# EAGLE board eagle_sample (EAGLE 9.6.2)
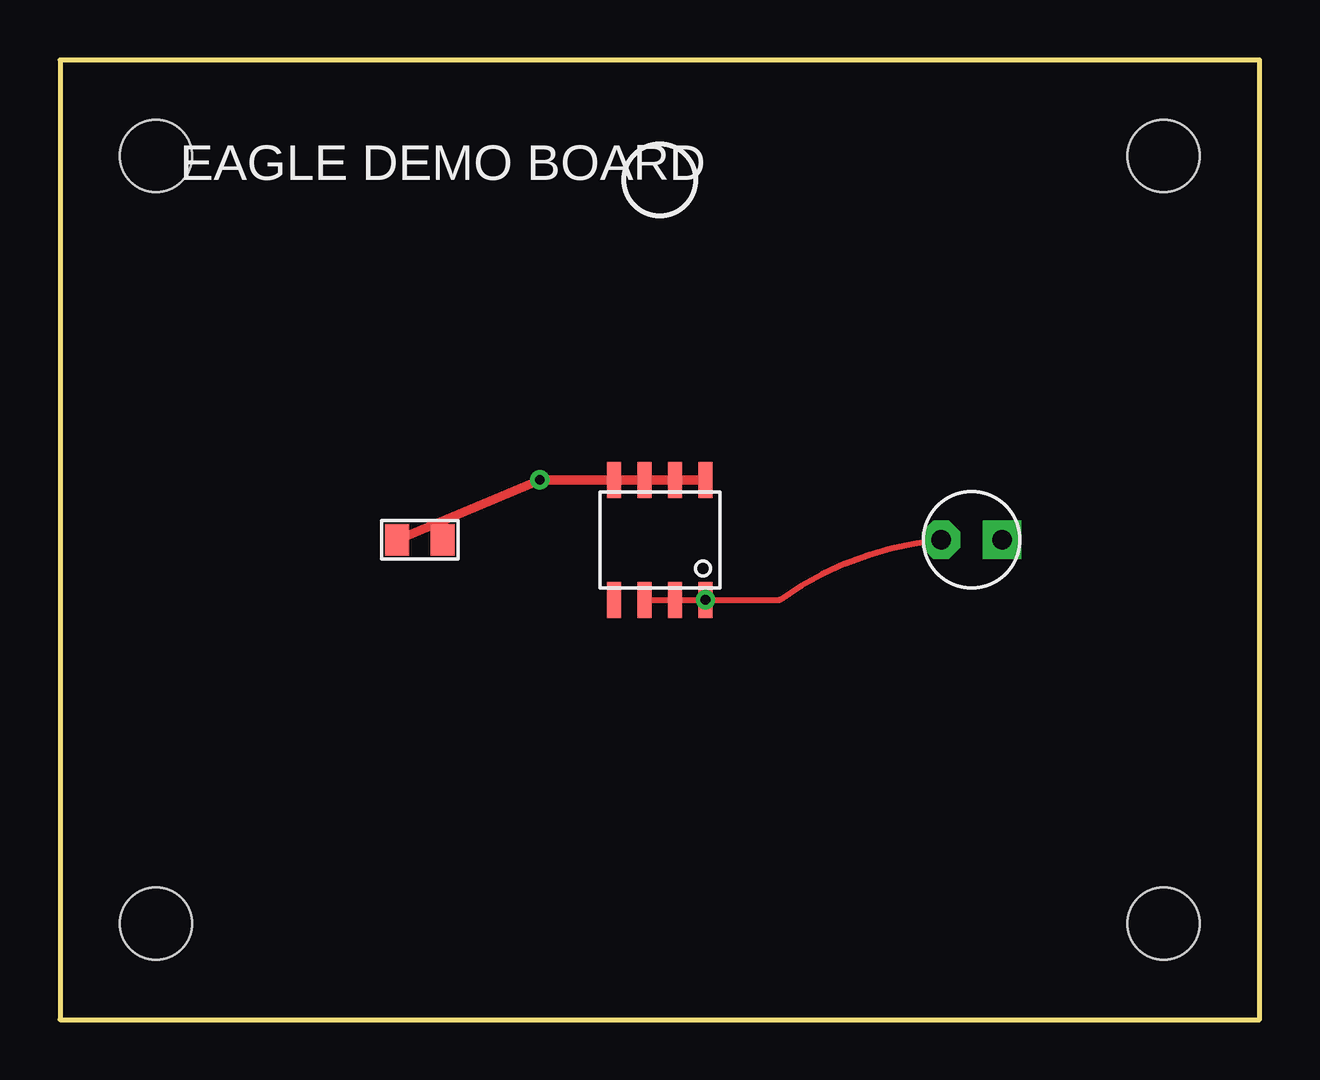
[diagram p0: board, top side]
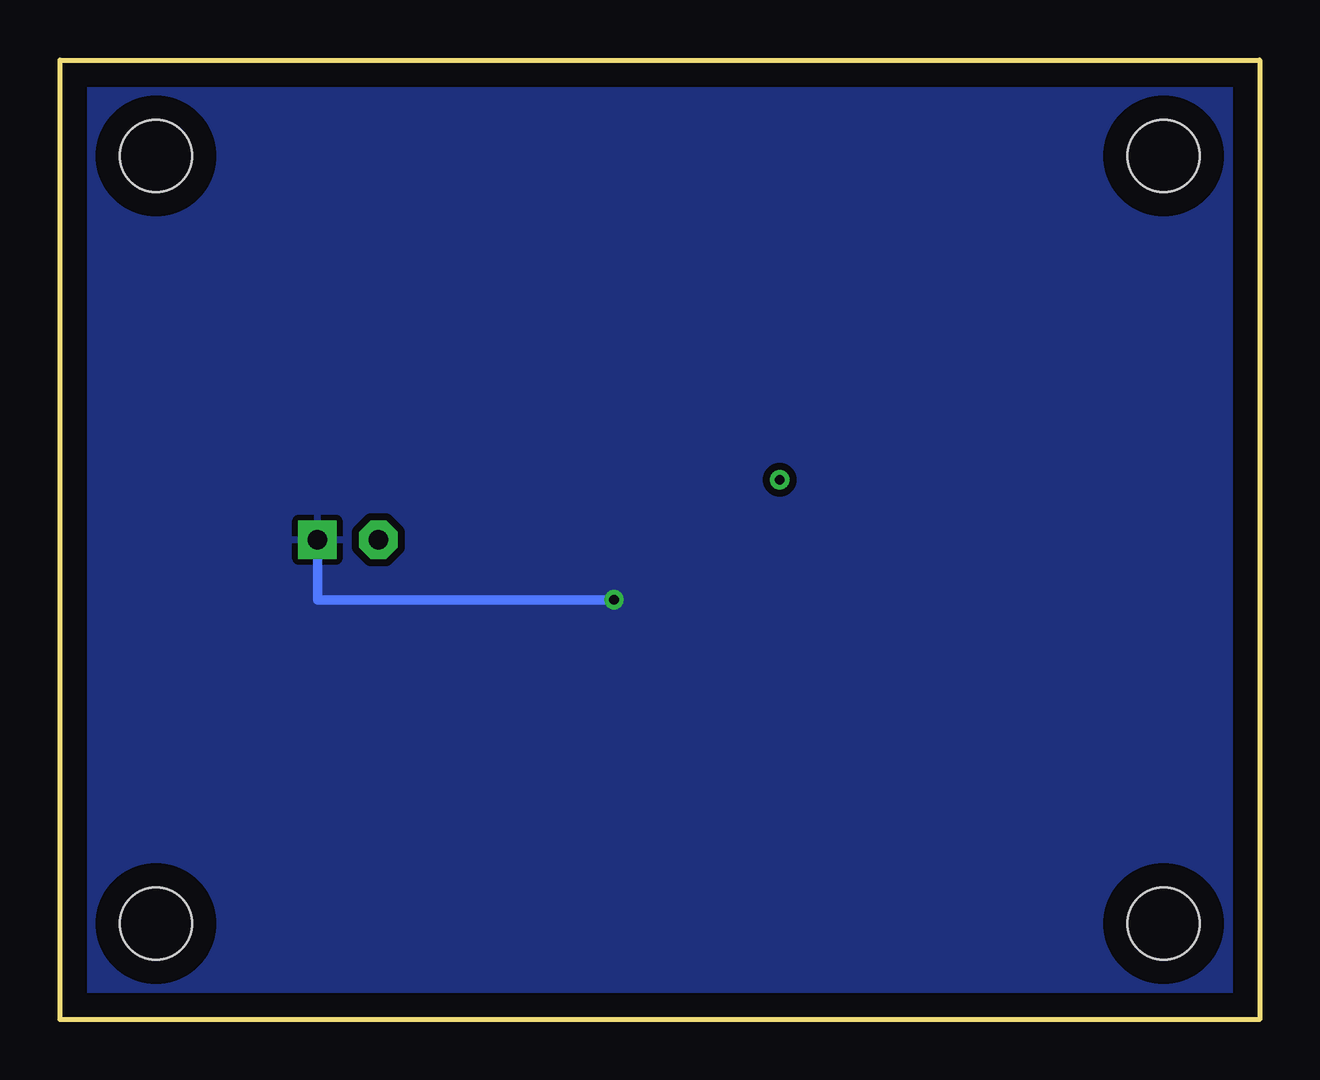
[diagram p1: board, bottom side, seen from below]

Size 50 x 40 mm. Coordinates in mm from the lower left corner, seen from the top.
Outline: 0,0 50,0 50,40 0,40 0,0
Copper layers used: Top, Bottom
Holes 3 mm at 4,4 46,4 4,36 46,36

## Footprints (pad centres in the part's own frame; a part is rotated, then mirrored left to right if it is on the bottom)
LED_TH = drill 0.8 pad 1.6 octagon: A -1.27,0 | drill 0.8 pad 1.6 square: K 1.27,0
R0805 = smd 1 x 1.3: 1 -0.95,0; 2 0.95,0
SOIC-8 = smd 1.5 x 0.6: 1 -2.5,-1.905; 2 -2.5,-0.635; 3 -2.5,0.635; 4 -2.5,1.905; 5 2.5,1.905; 6 2.5,0.635; 7 2.5,-0.635; 8 2.5,-1.905

## Placement (x,y rotation side)
D1  RED  [LED_TH]  38,20 0 top
R1  10k  [R0805]  15,20 0 top
U1  NE555  [SOIC-8]  25,20 90 top

## Library data of the parts
D1 R1 U1 = demo_lib

## Nets
GND: D1.K U1.1
SIG_OUT: D1.A U1.3
VCC: R1.1 U1.8

## Tracks (layer width: path | path; a pad name or v marks a point on that pad's centre or on a via)
GND  (via drill 0.4 pad 0.8)
  Bottom 0.4: U1.1 39.27,17.5 D1.K
  other vias: 26.91,17.5
  pour Bottom (isolate 0.3): 1,1 49,1 49,39 1,39
SIG_OUT
  Top 0.254: U1.3 30,17.5 arc-30 D1.A
VCC  (via drill 0.4 pad 0.8)
  Top 0.4: U1.8 v20,22.5 R1.1

## Text on the board
tPlace: EAGLE DEMO BOARD